# Altium PCB SyncBoard1.PcbDoc (part 3 of 4)
Units mm, origin at the board's own origin, x right, y up, seen from the top; angles counter-clockwise.
Board outline 300 x 250 mm, 2 copper layers (Top Layer, Bottom Layer); 311 components, 299 nets, 1572 pads, 3310 vias.
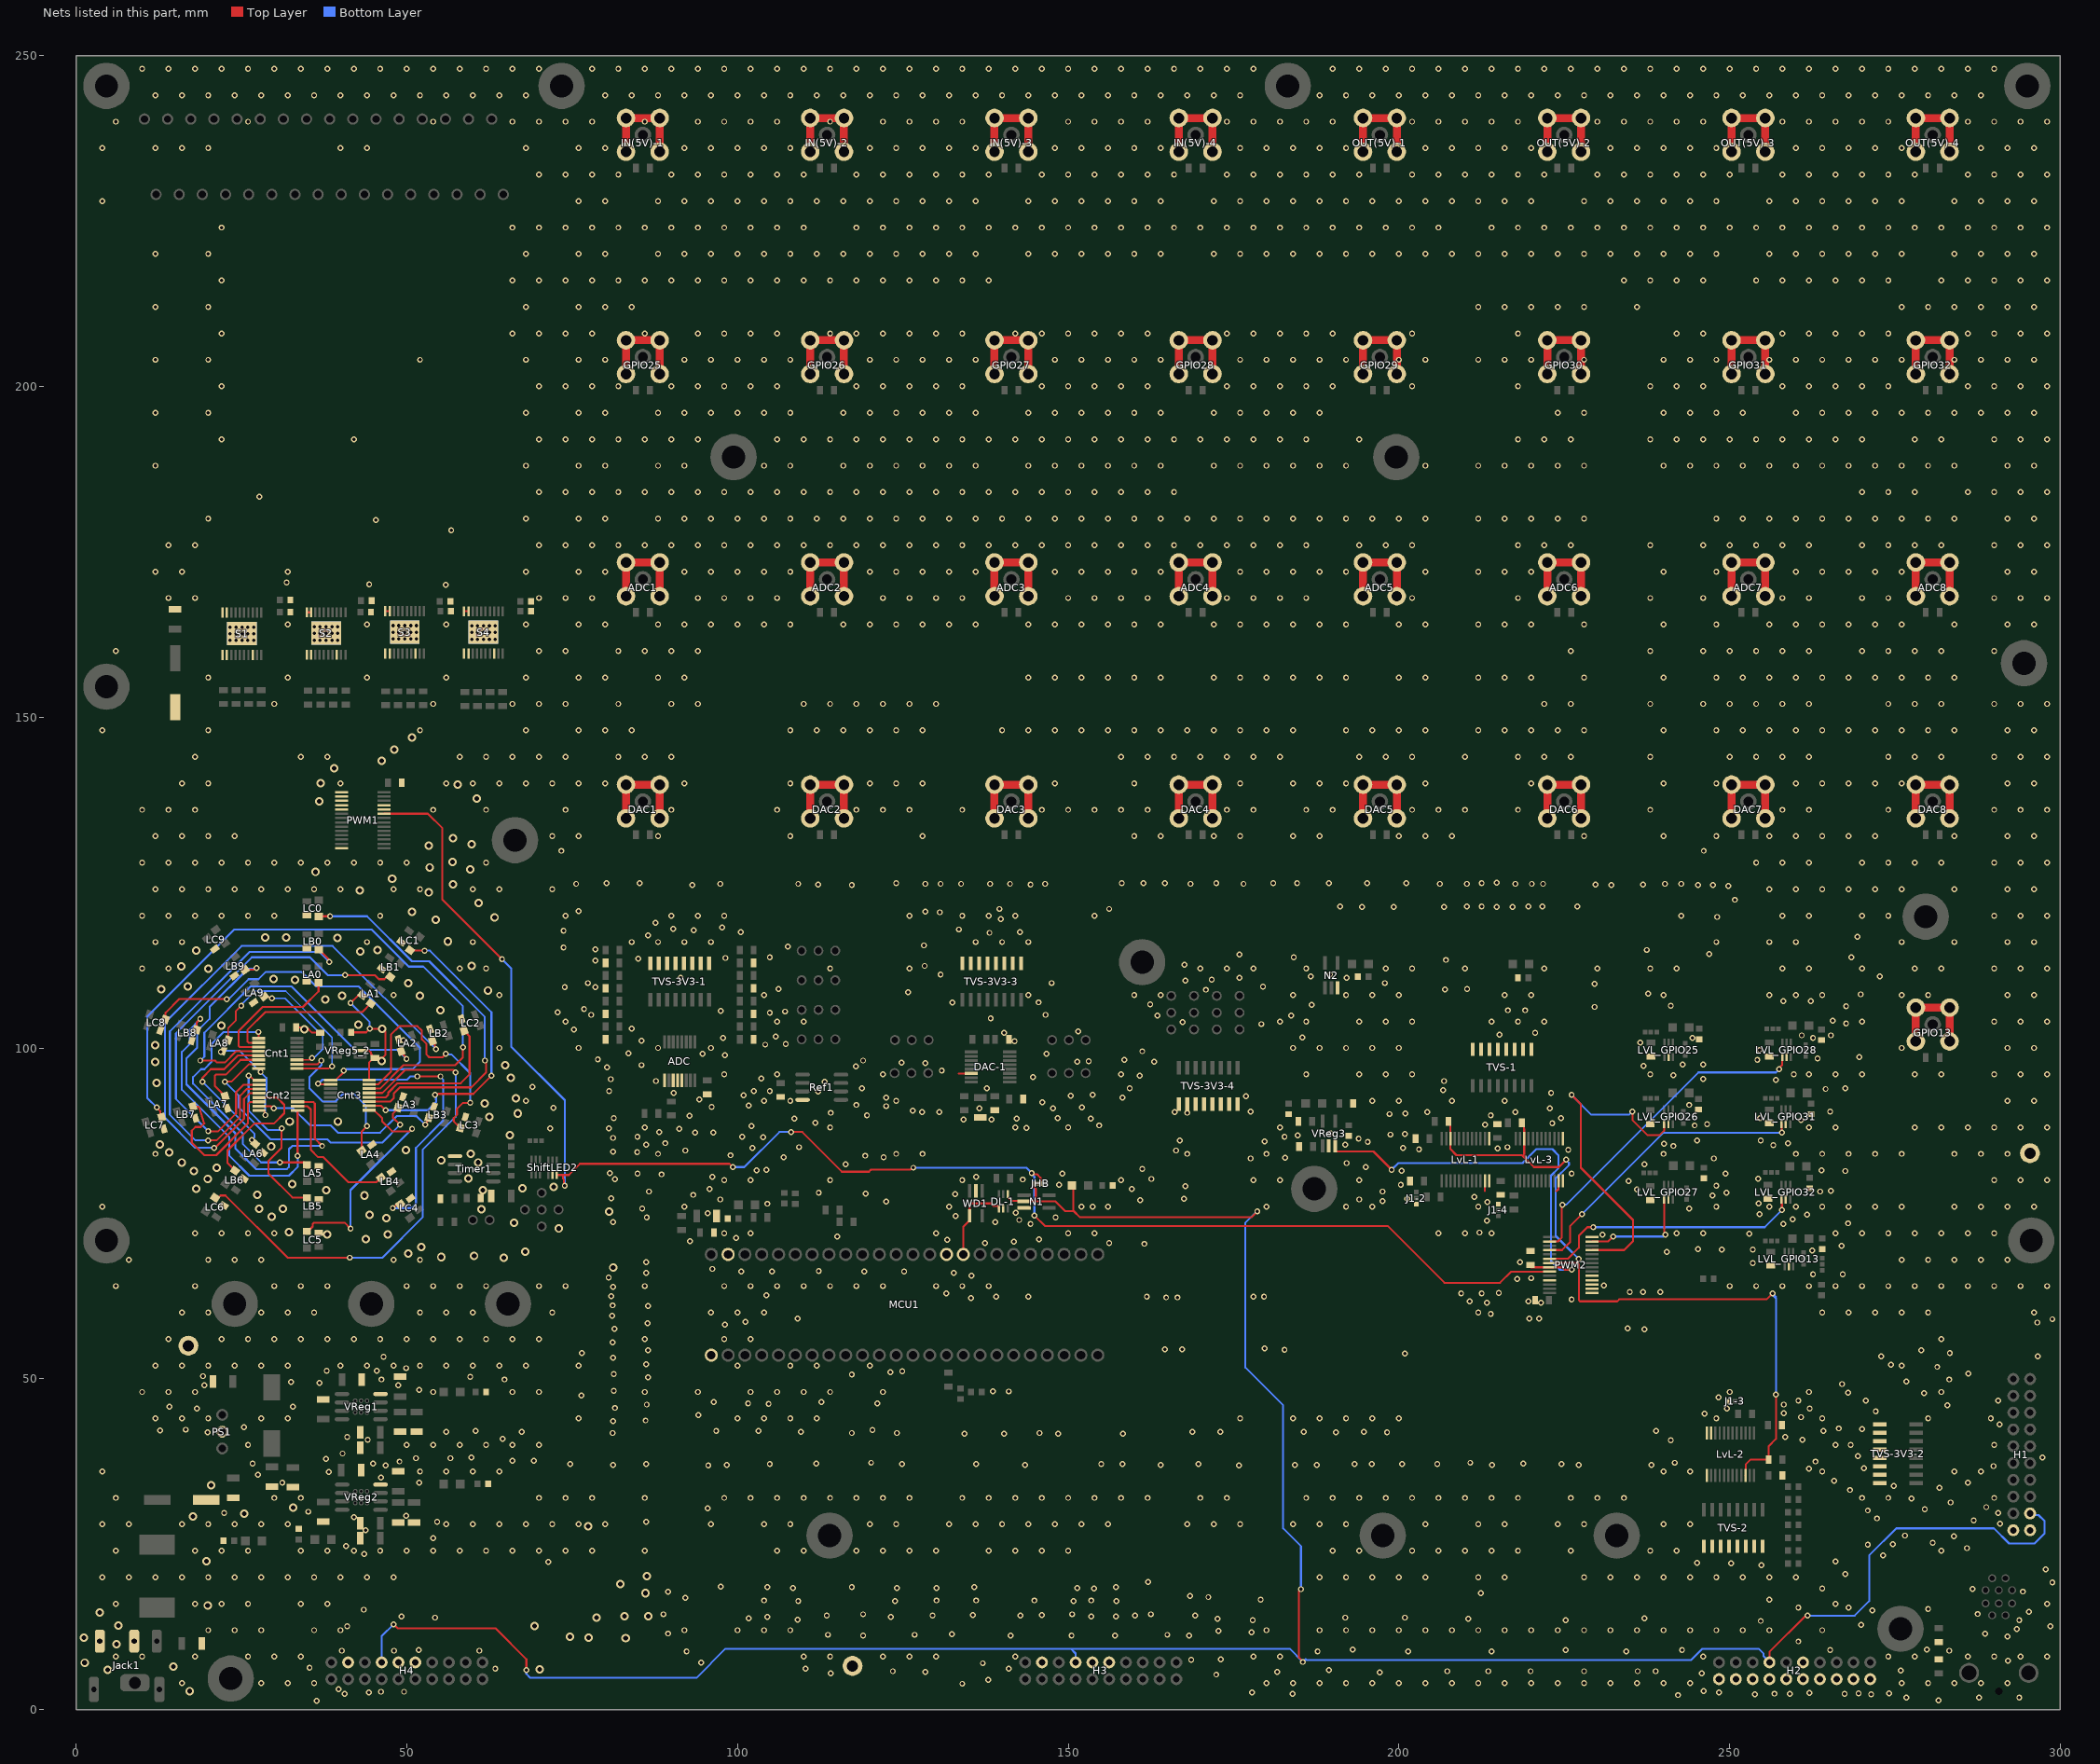
[diagram p3: the nets of this part, all layers, seen from the top]

## Via types
v1: diameter 0.9, hole 0.5, Top Layer to Bottom Layer, tented both sides, 3146 vias
v2: diameter 1.27, hole 0.711, Top Layer to Bottom Layer, tented both sides, 164 vias

## Nets (pads, with @x,y where several pads share a name; then routed paths per layer and width w, separated by ;. In a path a pad name is that pad's centre, name@x,y a point inside that pad or via, vN(x,y) a via of type N, cw(c..) or ccw(c..) an arc to the next point about the centre after c; other vN are vias at no path point) (continued)
en2: LVL_GPIO26.1 PWM2.11 | length 51.7
  Top Layer w0.3: v1(226.1,92.9) 227.5,91.5 227.5,81.9 235.4,74 235.4,70.8 234.05,69.45 PWM2.11@229.2,69.45 ; v1(235.3,90.4) 235.3,89.1 237.6,86.8 239.4,86.8 240.1,87.5 LVL_GPIO26.1@240.1,88.5
  Bottom Layer w0.3: v1(226.1,92.9) 229.1,89.9 234.8,89.9 v1(235.3,90.4)
en3: LVL_GPIO27.1 PWM2.13 | length 16.9
  Top Layer w0.3: PWM2.13@229.2,70.75 231.65,70.75 v1(232.4,71.5) ; LVL_GPIO27.1@240.1,77.1 240.1,72.162 240.3,71.962 v1(240.3,71.8)
  Bottom Layer w0.3: v1(232.4,71.5) 240,71.5 v1(240.3,71.8)
en4: LVL_GPIO28.1 PWM2.16 | length 50.5
  Top Layer w0.3: PWM2.16@222.8,70.75 224.05,70.75 224.6,71.3 224.6,76.2 v1@224.5,76.3 ; v1(257.5,96.8) 257.5,96.962 257.95,97.412 LVL_GPIO28.1@257.95,98.6
  Bottom Layer w0.3: v1@224.5,76.3 225.3,76.3 245.3,96.3 257,96.3 v1(257.5,96.8)
  other v1: 224.7,76.3
en5: LVL_GPIO31.1 PWM2.18 | length 45.2
  Top Layer w0.3: PWM2.18@222.8,69.45 224.65,69.45 225.9,70.7 225.9,73.1 v1(227.7,74.9) ; LVL_GPIO31.1@257.85,88.5 257.875,88.475 257.875,87.225 v1(257.9,87.2)
  Bottom Layer w0.3: v1(227.7,74.9) 240,87.2 v1(257.9,87.2)
en6: LVL_GPIO32.1 PWM2.20 | length 40.8
  Top Layer w0.3: PWM2.20@222.8,68.15 225.55,68.15 227.2,69.8 227.2,71.6 228.5,72.9 v1(229.4,72.9) ; LVL_GPIO32.1@257.85,77.1 257.875,77.075 257.875,76.425 257.9,76.4 v1(257.9,75.5)
  Bottom Layer w0.3: v1(229.4,72.9) 255.3,72.9 v1(257.9,75.5)
En7: LvL-1.22 LvL-2.22 LvL-3.22 PWM2.21 R1-9.2 R1-11.2 R1-13.2 | length 118.5
  Top Layer w0.3: R1-9.2@207.8,88.9 LvL-1.22@207.8,86.3 207.8,84.7 208.7,83.8 218.6,83.8 218.95,83.45 ; R1-13.2@218.6,88.7 218.9,88.4 218.9,87.8 218.95,87.75 LvL-3.22@218.95,86.3 218.95,83.45 ; PWM2.21@222.8,67.5 227.024,67.5 ; v1(225.3,83.1) 224.2,82 220.4,82 218.95,83.45 ; v1(227.2,68.1) 227.085,67.985 227.085,67.561 227.024,67.5 ; LvL-2.22@252.4,35.4 252.425,35.425 252.425,37.025 253.2,37.8 R1-11.2@255.9,37.8 255.9,39.8 257,40.9 v1(257,47.6) ; v1(256.5,62.9) 255.6,62 233.3,62 233,61.7 227.376,61.7 227.2,61.876 227.2,67.324 227.024,67.5
  Bottom Layer w0.3: v1(225.3,83.1) 225.3,83.024 225.7,82.624 225.7,82.3 223.7,80.3 223.7,71.6 225.6,69.7 v1(227.2,68.1) ; v1(257,47.6) 257,62.138 256.5,62.638 v1(256.5,62.9) 257,62.4
En8: PWM2.22 R1-7.2 VReg3.3 | length 63.8
  Top Layer w0.3: VReg3.3@190.35,85.2 190.35,84.475 190.475,84.35 196.15,84.35 v1(198.9,81.6) ; R1-7.2@219.9,66.9 219.95,66.85 PWM2.22@222.8,66.85 224.724,66.85 225.074,66.5 226.111,66.5 v1(226.121,66.511)
  Bottom Layer w0.3: v1(198.9,81.6) 199.9,82.6 218.69,82.6 220.79,84.7 223.2,84.7 224.1,83.8 224.1,81.8 223,80.7 223,67.8 224.3,66.5 226.111,66.5 v1(226.121,66.511)
GND: ADC1.2 ADC2.2 ADC3.2 ADC4.2 ADC5.2 ADC6.2 ADC7.2 ADC8.2 ADC.9 ADC.11 ADC.12 ADC.13 C1-2.1 C1-3.1 C1-4.1 C1-8.1 C1-9.1 C1-10.2 C1-11.1 C1-12.1 C1-13.2 C1-14.1 C1-15.2 C1-16.1 C1-17.2 C1-18.1 C1-19.1 C1-20.1 C1-21.1 C1-22.1 C1-23.1 C1-24.1 C1-25.2 C1-26.2 C2-1.1 C2-2.2 C3-1.2 C3-2.2 C3-2B.2 C3-3.2 C3-4.2 C4-1.2 C4-2.2 C4-3.2 C4-4.1 C4-5.1 C4-6.1 C4-7.1 C4-8.2 C4-9.2 C4-10.2 C4-11.1 C4-12.1 C4-13.1 C4-14.1 C5-1.1 C5-2.1 C5-3.1 C5-4.1 C5-5.1 C5-6.1 C5-7.1 C5-8.1 C6-1.2 C6-2.2 C7-1.2 C7-2.2 C8-1.1 C8-2.1 C9-1.1 CE-1.2 CE-1B.2 Cnt1.8 Cnt2.8 Cnt3.8 DAC1.2 DAC2.2 DAC3.2 DAC4.2 DAC5.2 DAC6.2 DAC7.2 DAC8.2 DAC-1.14 DL-1.2 GPIO13.2 GPIO25.2 GPIO26.2 GPIO27.2 GPIO28.2 GPIO29.2 GPIO30.2 GPIO31.2 GPIO32.2 H1.10 H1.11 H2.1 H2.2 H2.3 H2.4 H2.5 H2.6 H2.7 H2.8 H2.9 H2.10 H2.16 H3.12 H3.15 H3.16 H4.12 H4.15 H4.16 IN(5V)-1.2 IN(5V)-2.2 IN(5V)-3.2 IN(5V)-4.2 J1-2.3 J1-3.3 J1-4.3 Jack1.2 Jack1.3 LA0.2 LA1.2 LA2.2 LA3.2 LA4.2 LA5.2 LA6.2 LA7.2 LA8.2 LA9.2 LB0.2 LB1.2 LB2.2 LB3.2 LB4.2 LB5.2 LB6.2 LB7.2 LB8.2 LB9.2 LC0.2 LC1.2 LC2.2 LC3.2 LC4.2 LC5.2 LC6.2 LC7.2 LC8.2 LC9.2 LvL-1.11 LvL-1.12 LvL-1.13 LvL-2.11 LvL-2.12 LvL-2.13 LvL-3.11 LvL-3.12 LvL-3.13 LVL_GPIO13.2 LVL_GPIO25.2 LVL_GPIO26.2 LVL_GPIO27.2 LVL_GPIO28.2 LVL_GPIO31.2 LVL_GPIO32.2 MCU1.0 MCU1.33 MCU1.46 N1.3 N2.3 OUT(5V)-1.2 OUT(5V)-2.2 OUT(5V)-3.2 OUT(5V)-4.2 PS1.2 PWM1.1 PWM1.2 PWM1.3 PWM1.4 PWM1.5 PWM1.14 PWM1.24 PWM1.25 PWM2.1 PWM2.2 PWM2.3 PWM2.4 PWM2.5 PWM2.14 PWM2.25 R1-1.2 R1-7.1 R1-31.2 R1-32.2 R2-1.1 R3-4.1 R3-5.1 R6-1.2 R6-1B.2 R6-2.2 R6-2B.2 R6-3.2 R6-4.2 R6-5.2 R6-6.2 R6-7.2 R6-8.2 R6-9.2 R6-10.2 R6-11.2 R6-12.2 R6-13.2 R6-14.2 R7-1.2 R7-2.2 R7-3.2 R7-4.2 R7-5.2 R7-6.2 R7-7.2 R7-8.2 Ref1.4 S1.1 S1.2 S1.8 S1.19 S1.20 S1.21 S2.1 S2.2 S2.8 S2.19 S2.20 S2.21 S3.1 S3.2 S3.8 S3.19 S3.20 S3.21 S4.1 S4.2 S4.8 S4.19 S4.20 S4.21 ShiftLED2.2 T1.1 T2.1 T3.1 Timer1.1 TVS-1.1 TVS-1.2 TVS-1.3 TVS-1.4 TVS-1.5 TVS-1.6 TVS-1.7 TVS-1.8 TVS-2.1 TVS-2.2 TVS-2.3 TVS-2.4 TVS-2.5 TVS-2.6 TVS-2.7 TVS-2.8 TVS-3V3-1.1 TVS-3V3-1.2 TVS-3V3-1.3 TVS-3V3-1.4 TVS-3V3-1.5 TVS-3V3-1.6 TVS-3V3-1.7 TVS-3V3-1.8 TVS-3V3-2.1 TVS-3V3-2.2 TVS-3V3-2.3 TVS-3V3-2.4 TVS-3V3-2.5 TVS-3V3-2.6 TVS-3V3-2.7 TVS-3V3-2.8 TVS-3V3-3.1 TVS-3V3-3.2 TVS-3V3-3.3 TVS-3V3-3.4 TVS-3V3-3.5 TVS-3V3-3.6 TVS-3V3-3.7 TVS-3V3-3.8 TVS-3V3-4.1 TVS-3V3-4.2 TVS-3V3-4.3 TVS-3V3-4.4 TVS-3V3-4.5 TVS-3V3-4.6 TVS-3V3-4.7 TVS-3V3-4.8 VReg1.4 VReg2.4 VReg3.2 VReg5_2.2 WD1.2 | length 52
  Top Layer w0.3: v1@27.6,96.675 Cnt1.8@27.6,96.9 ; Cnt2.8@27.7,90.55 28.475,90.55 28.55,90.475 28.55,89.925 v1(28.621,89.854) ; R1-32.2@33.3,103.1 34.9,103.1 35.7,102.3 C7-2.2@36.9,102.3 ; S2.20@34.875,165.85 S2.19@35.525,165.85 ; v1(41.5,106.8) 42.65,107.95 43.212,107.95 LA1.2@43.231,107.931 ; C8-2.1@41.576,102.359 43.859,102.359 v1(44.4,102.9) 46.4,102.9 46.8,102.5 46.8,99 46.3,98.5 C6-2.2@45.2,98.5 C6-2.2@45,98.5 ; VReg5_2.2@42.956,99.607 44.293,99.607 44.6,99.3 44.6,99.1 44.7,99 44.7,98.8 C6-2.2@45,98.5 ; Cnt3.8@44.3,95.15 44.3,97.8 C6-2.2@45,98.5 ; S3.20@46.775,166.016 S3.19@47.425,166.016 ; S4.20@58.675,166 S4.19@59.325,166 ; 133.47,96.15 DAC-1.14@135.346,96.15 ; 213,78.38 LvL-1.11@213,79.9 ; 223.75,78.36 223.829,78.36 224.125,78.656 224.125,79.875 LvL-3.11@224.15,79.9
  Bottom Layer w0.3: v1(21.9,99.4) 22.1,99.6 24.675,99.6 28.8,95.475 28.8,92.835 28.621,92.656 v1(28.621,89.854) ; v1(41.5,106.8) 44.4,103.9 v1(44.4,102.9)
  other v1: 36.4,1.3 281.6,1.4 276.7,1.8 287.7,1.8 293.8,1.8 242.2,2.2 253.8,2.3 271.4,2.3 40.6,2.4 183.9,2.4 259.1,2.4 267.38,2.4 256.8,2.41 274.12,2.44 269.5,2.47 262.04,2.54 44.3,2.6 177.8,2.6 248.4,2.6 46.1,2.7 49.6,2.7 246.08,2.81 39.7,3.1 134,3.9 16,4 28,4 32,4 36,4 180,4 184,4 188,4 192,4 196,4 200,4 204,4 208,4 212,4 216,4 220,4 224,4 228,4 232,4 236,4 240,4 244,4 276,4 280,4 284,4 288,4 292,4 137.9,4.5 172.4,5.3 114.1,5.5 245.8,5.5 197.1,5.6 128.4,5.7 181.6,5.7 123.5,5.8 207.3,5.8 213.5,5.8 219.9,5.8 228,5.8 236.1,5.8 238.8,5.8 275.9,5.9 189.4,6 63.4,6.2 110.3,6.2 141,6.2 35.3,6.3 137.1,7 94.5,7.1 292.1,7.4 168.6,7.5 173.1,7.6 6,8 10,8 18,8 26,8 30,8 34,8 110,8 114,8 122,8 126,8 130,8 142,8 178,8 182,8 246,8 274,8 278,8 286,8 290,8 294,8 298,8 92.3,8.8 187.7,8.8 201.4,8.8 214,8.8 234.4,8.8 40.2,8.9 48.1,8.9 61,8.9 283.2,8.9 51.8,9 225.2,9 242.8,9 265.2,9 193,9.1 279.8,9.1 260.4,10.3 291.99,11.04 119,11.2 141.3,11.2 150.5,11.2 157.1,11.2 168.3,11.2 113.7,11.3 126.8,11.3 165,11.3 132.4,11.4 288.62,11.46 89.5,11.5 177.7,11.7 172.7,11.9 20,12 24,12 28,12 36,12 40,12 92,12 100,12 104,12 108,12 180,12 188,12 192,12 196,12 200,12 204,12 208,12 212,12 216,12 220,12 224,12 228,12 232,12 236,12 240,12 244,12 248,12 252,12 256,12 264,12 293.4,12.15 41,12.6 298.5,12.6 269.9,12.8 254.7,13.4 177.9,13.5 225.2,13.5 293.8,13.5 109.1,13.6 172.6,13.7 210.5,13.7 101.7,13.8 237.1,13.8 54.3,13.9 191.9,13.9 200.9,13.9 104.5,14 123.2,14 49.2,14.1 153.5,14.1 157.2,14.1 113.5,14.2 129.5,14.2 142.8,14.2 160.1,14.2 169.2,14.2 135.6,14.3 146,14.3 88.8,14.4 119,14.4 150.6,14.4 162.5,14.4 287.48,14.46 295.27,14.8 271.6,15 43.5,15.1 280,15.2 260.4,15.4 268,15.4 6,16 18,16 22,16 26,16 34,16 38,16 266,16 298,16 109.2,16.4 123.8,16.4 150.8,16.4 157.3,16.4 104,16.5 130.1,16.5 136.1,16.5 144.9,16.5 153.5,16.5 179.1,16.6 256,16.6 92.1,16.9 171.2,17 168.4,17.2 212.4,17.6 89.5,17.8 294.33,17.84 286.71,18.21 153.9,18.3 264,18.3 108.4,18.4 124.1,18.4 130.1,18.4 151.4,18.4 104.5,18.5 117.3,18.5 135.8,18.5 157.2,18.5 97.5,18.6 298.8,19.2 162.1,19.3 4,20 8,20 12,20 16,20 20,20 24,20 28,20 32,20 36,20 40,20 44,20 48,20 188,20 192,20 196,20 200,20 204,20 212,20 216,20 228,20 232,20 236,20 240,20 244,20 248,20 252,20 256,20 260,20 267.5,20.5 297.8,21.2 254.8,21.8 250.2,22.1 245.1,22.2 71.4,22.3 266,22.4 273.205,23.315 43.6,23.5 6,24 18,24 22,24 26,24 34,24 38,24 42,24 46,24 50,24 54,24 58,24 62,24 66,24 70,24 74,24 78,24 86,24 106,24 110,24 118,24 122,24 126,24 130,24 138,24 142,24 146,24 150,24 190,24 194,24 202,24 206,24 210,24 214,24 218,24 226,24 238,24 242,24 282,24 285.9,24.4 40.8,24.7 270.9,24.9 274.7,25 280.7,25.2 54,25.9 283.9,26.2 276.5,26.3 43.8,27.1 4,28 8,28 16,28 20,28 24,28 28,28 32,28 56,28 60,28 64,28 68,28 72,28 76,28 80,28 96,28 104,28 108,28 120,28 124,28 132,28 136,28 140,28 144,28 148,28 152,28 156,28 168,28 172,28 176,28 184,28 188,28 192,28 204,28 212,28 216,28 224,28 228,28 240,28 244,28 290.9,28.1 54.6,28.4 86.2,28.4 286.9,28.6 272.3,28.9 42,29.1 49.9,29.3 22.4,29.7 290.6,29.7 35.1,29.9 270.9,30.1 279.5,30.3 95.5,30.4 288.8,30.6 283.4,31.3 277.5,31.9 6,32 30,32 34,32 70,32 74,32 78,32 86,32 98,32 102,32 106,32 110,32 114,32 118,32 122,32 126,32 134,32 138,32 142,32 146,32 150,32 154,32 158,32 162,32 170,32 174,32 186,32 190,32 194,32 198,32 202,32 206,32 210,32 214,32 218,32 226,32 230,32 234,32 270,32 274,32 290,32 268.2,33.2 281.7,33.5 274.8,33.8 31.2,34.3 51.9,34.3 286,34.3 265.8,34.6 46.1,35.1 27.5,35.5 38.2,35.9 4,36 52,36 56,36 60,36 64,36 240,36 244,36 264,36 284,36 288,36 262,36.4 270.3,36.5 289.9,36.8 46.8,36.9 95.6,36.9 175.8,36.9 81.2,37 98.4,37 143.5,37 164,37 184.3,37 187.6,37 214.1,37 227.2,37 238.2,37 74.7,37.1 86.2,37.1 104.9,37.1 124.9,37.1 136.1,37.1 155,37.1 158.2,37.1 169.7,37.1 193.3,37.1 195.9,37.1 200.5,37.1 205.8,37.1 224.6,37.1 26.7,37.2 44.9,37.2 111.9,37.2 218.8,37.2 120.2,37.3 210.8,37.3 241.7,37.3 48.9,37.5 263,37.5 66,37.6 69.2,37.6 37.8,37.9 51.4,38 56.6,38 59.8,38.1 297.3,38.1 269.4,38.3 40.3,38.7 26,40 50,40 54,40 58,40 62,40 66,40 70,40 266,40 268.3,40 290,40 241.1,40.7 44.1,40.8 261,40.8 64.5,40.9 41,41.2 258.4,41.2 134.3,41.7 140.3,41.7 148.5,41.7 158.3,41.7 81.1,41.8 117.3,41.8 124.1,41.8 145.67,41.8 19.9,41.9 190.5,41.9 198.2,41.9 56,42 67.4,42 109.6,42 168.8,42 173,42 185.6,42 194.7,42 60.4,42.1 96.8,42.1 103.2,42.1 238.9,42.1 264.2,42.1 12.7,42.2 120.41,42.24 16.6,42.3 270,42.4 266.5,42.5 25.4,42.7 290.8,43.1 81.2,43.6 86.1,43.7 12,44 16,44 20,44 28,44 32,44 76,44 100,44 104,44 108,44 112,44 176,44 184,44 188,44 192,44 196,44 200,44 248,44 264,44 280,44 289.5,44 260.8,44.2 94.1,44.5 246.2,44.7 258.2,44.8 272.1,45.1 18.3,45.5 249.6,45.5 262.1,45.5 81.5,45.6 14.1,45.8 32.8,45.8 282.9,46 86.3,46.1 258.2,46.1 104.7,46.2 101.6,46.3 121.16,46.3 96.4,46.5 112.7,46.5 260.4,46.7 270.6,46.7 290.6,46.7 248.3,47.2 76.4,47.5 279.4,47.8 267.9,47.9 10,48 14,48 18,48 54,48 66,48 70,48 86,48 94,48 102,48 106,48 110,48 114,48 122,48 250,48 262,48 282,48 140.99,48.08 138.64,48.12 81.3,48.2 51.9,48.3 19.4,49 48.7,49 267,49.2 36.8,49.4 32.5,49.5 276.7,49.6 46.2,49.9 64.8,49.9 283.2,49.9 86.5,50.2 59.6,50.3 19.2,50.4 117.3,50.65 81.3,50.7 286.1,50.8 123.1,50.97 124.92,51.15 37.9,51.2 45.5,51.2 49.9,51.6 281.4,51.8 12,52 16,52 20,52 24,52 28,52 32,52 40,52 44,52 48,52 52,52 56,52 60,52 64,52 68,52 76,52 100,52 108,52 112,52 120,52 276,52 274.4,52.1 86.2,52.2 81.2,53.2 46.5,53.3 272.9,53.4 296.6,53.4 200.9,53.8 76.5,53.9 283.3,53.9 86.5,54.3 279,54.3 182.7,54.4 164.64,54.47 167.2,54.46 179.7,54.6 81.1,55.5 14,56 22,56 26,56 30,56 34,56 38,56 42,56 46,56 50,56 54,56 58,56 62,56 66,56 70,56 86,56 98,56 102,56 282,56 237.1,57.5 81.39,57.575 234.6,57.6 98.1,58.2 86.4,58.4 296.5,58.5 101.2,58.6 298.8,59 109.1,59.1 219.7,59.1 221.2,59.1 81.08,59.5 213.9,59.8 16,60 20,60 28,60 32,60 36,60 52,60 56,60 60,60 72,60 96,60 100,60 104,60 212,60 264,60 268,60 272,60 276,60 280,60 296,60 86.5,61 81.1,61.1 213.3,61.5 221.5,61.5 210.7,61.7 219.6,61.7 226.1,62 135.3,62.2 164.8,62.3 166.5,62.3 139.1,62.4 144,62.4 161.9,62.4 178,62.4 179.6,62.4 80.92,62.5 104.4,62.6 131.6,62.9 209.4,62.9 212.5,62.9 215.1,63 234.9,63.1 236.9,63.1 239.5,63.1 81.2,63.9 6,64 18,64 30,64 34,64 38,64 50,64 54,64 58,64 62,64 70,64 74,64 86,64 98,64 102,64 106,64 110,64 114,64 118,64 122,64 130,64 134,64 138,64 250,64 254,64 258,64 262,64 266,64 270,64 274,64 278,64 282,64 286,64 290,64 294,64 298,64 231,64.1 217.9,65.1 220,65.2 80.53,65.29 135.4,65.6 262.6,65.8 267.1,65.8 86.2,66 132.7,66 100.6,66.2 105.2,66.2 119.2,66.2 125.2,66.2 112.3,66.3 96.2,66.6 253.5,67.5 86.2,67.6 218.3,67.6 8,68 20,68 24,68 28,68 48,68 52,68 276,68 280,68 284,68 288,68 292,68 240.5,69.2 262.5,69.4 248.8,69.5 253.5,69.5 245.2,69.6 266.9,70.1 161.5,70.4 137.4,70.5 156.2,70.5 141.8,70.7 92.8,70.8 131.7,71 145.6,71.1 99.8,71.3 115.1,71.5 230.8,71.8 253,71.9 18,72 22,72 26,72 30,72 98,72 102,72 130,72 150,72 154,72 206,72 210,72 214,72 242,72 246,72 266,72 270,72 274,72 278,72 282,72 286,72 290,72 212.2,72.1 144.3,73.4 258.1,73.4 267.9,73.5 81.2,73.7 139,73.7 213.3,73.9 142.6,74 259.5,74.1 86.3,74.4 148.1,74.4 133,74.6 261.7,74.8 254.5,74.9 95.5,75 142.1,75.1 85.6,75.7 243.91,75.75 4,76 92,76 132,76 152,76 153.7,76 156,76 180,76 192,76 196,76 212,76 248,76 256,76 260,76 264,76 268,76 272,76 276,76 284,76 288,76 292,76 296,76 104.536,76.461 254.4,76.5 213.4,76.7 122.5,76.8 197.52,76.84 160.9,77 97.4,77.1 194,77.1 167.5,77.2 201.25,77.22 80.9,77.3 211.4,77.5 247.4,77.7 93.3,77.8 132.9,77.9 119.4,78 112.3,78.1 249.5,78.1 86.6,78.3 197.5,78.3 263.7,78.3 265.3,78.4 236,78.64 95.8,78.7 159.6,78.7 167.7,79.1 248,79.2 148.6,79.3 200.3,79.32 234.73,79.87 98,80 102,80 114,80 134,80 158,80 178,80 182,80 194,80 290,80 294,80 298,80 81.48,80.14 143.108,80.124 162.6,80.2 254.296,80.259 96.2,80.5 136.1,80.5 88.5,80.9 84.9,81 149.1,81 226.1,81 249.4,81 80.7,81.1 267.5,81.4 200.4,81.45 102.9,81.52 263.9,81.5 104.4,81.6 161.2,81.7 195,82 237.1,82.4 116.35,82.44 192.1,82.6 177.6,83.3 247.6,83.3 182.8,83.4 107,83.5 122.1,83.5 119.31,83.72 98.98,83.79 12,84 88,84 124,84 128,84 168,84 180,84 240,84 260,84 264,84 268,84 272,84 276,84 284,84 288,84 292,84 84.83,84.25 81.2,84.3 92.1,84.5 166.3,84.5 225.6,84.6 203.048,84.65 214.9,84.8 102.27,84.9 200.6,84.9 109.3,85 216.4,85 241.5,85.2 256.6,85.3 86.2,85.4 191.9,85.4 240.1,85.5 258.8,85.6 89.1,85.62 195.3,85.8 179.7,85.9 166.9,86 245.1,86 254.7,86 193.9,86.3 81.2,86.4 103.9,86.5 84.89,86.58 100.69,86.6 182.7,86.6 184.7,86.8 198.7,86.9 200.9,87 189.7,87.1 93.59,87.19 96.34,87.22 88.2,87.3 91.21,87.77 71.68,87.85 80.57,87.86 143.7,87.9 86,88 114,88 142,88 150,88 182,88 262,88 266,88 278,88 282,88 286,88 290,88 294,88 298,88 102.1,88.2 154.7,88.3 244.7,88.3 213,88.4 246.6,88.5 223.2,88.6 111.8,88.7 260.8,89.1 134.2,89.2 138.4,89.2 108.6,89.3 142.2,89.3 153.4,89.3 81.3,89.4 148.4,89.4 224.5,89.4 254.6,89.4 92.758,89.742 213.9,89.8 119.57,89.82 198.6,90 201,90.1 114.1,90.2 168,90.2 127.9,90.3 130.5,90.3 166.1,90.3 204.3,90.3 217.6,90.3 177.6,90.4 265.2,90.4 126.5,90.5 136.6,90.9 147.7,90.9 222.8,90.9 72.19,90.97 152.1,91 96.1,91.1 122.5,91.2 101.7,91.3 118,91.4 243.9,91.4 146.1,91.8 68,92 104,92 108,92 124,92 196,92 200,92 208,92 216,92 292,92 296,92 94.21,92.21 122.5,92.5 158.2,92.5 176.9,92.7 150.4,92.8 100.91,92.87 153.7,92.9 90.38,93.19 223,93.2 112.2,93.4 80.6,93.5 102.5,93.5 104.9,93.5 206.7,93.6 264.5,93.8 118.8,93.9 137.7,93.9 159.3,93.9 267.5,93.9 69.01,94.11 113.2,94.9 87.7,95 206.8,95 257,95.2 80.83,95.28 246,95.3 103.6,95.4 144.7,95.6 160.8,95.8 241.5,95.9 98,96 106,96 122,96 158,96 186,96 194,96 198,96 202,96 238,96 259.7,96 262,96 266,96 270,96 278,96 282,96 290,96 294,96 298,96 27.9,96.375 130.9,96.6 80.3,97.1 117.9,97.2 237,97.3 85.5,97.4 242.9,97.5 246,97.5 128.4,97.7 124.8,97.8 151.4,97.9 163,97.9 153.1,98 119,98.1 158.5,98.2 254.2,98.2 78.9,98.3 263.3,98.4 269.6,98.6 98.1,98.9 94.7,99.1 146.7,99.1 83.5,99.2 161.2,99.5 254.5,99.7 64,100 76,100 88,100 96,100 184,100 188,100 192,100 196,100 200,100 276,100 292,100 296,100 104.2,100.5 107.3,100.6 236.5,100.8 141.9,101 85.5,101.1 49.512,101.15 97.8,101.5 244.4,101.5 262.6,101.5 185.4,101.6 105.8,101.7 260.9,101.9 265.3,101.9 215.2,102 140.3,102.3 220.6,102.3 151.5,102.5 75.3,102.8 84,102.9 179.2,103.6 267.6,103.7 167.3,103.9 74,104 106,104 110,104 182,104 186,104 194,104 198,104 202,104 214,104 218,104 222,104 270,104 290,104 294,104 298,104 265.6,104.1 138.3,104.5 163.5,104.9 183.7,104.9 77.9,105 146.6,105 104.9,105.3 72.8,105.4 107.2,105.5 97.5,105.6 216.5,105.7 219.1,105.7 76.8,105.9 229.6,106.2 267.6,106.3 241.1,106.4 186.8,106.5 162.4,106.6 132.487,106.889 145.5,106.9 258.1,107.1 262.3,107.1 48,108 64,108 104,108 144,108 160,108 164,108 184,108 192,108 196,108 200,108 216,108 220,108 240,108 256,108 260,108 264,108 276,108 280,108 292,108 296,108 269.8,108.1 237.7,108.2 125.8,108.4 170.8,108.8 206.98,108.83 106.2,108.9 210.31,108.9 73.9,109.2 78.5,109.2 179.45,109.24 229.6,109.7 77.4,109.8 147.5,109.8 197.9,109.8 167.7,110.2 171.7,110.3 91.4,110.6 175.9,110.6 192.1,110.6 186.7,110.8 272.7,110.8 130.7,111.1 189.6,111.1 10,112 14,112 58,112 62,112 114,112 126,112 170,112 174,112 178,112 186,112 198,112 202,112 210,112 222,112 230,112 238,112 242,112 258,112 262,112 270,112 278,112 282,112 290,112 294,112 298,112 128.3,112.4 167.6,112.6 78.5,113.2 207.09,113.31 85,113.5 98.2,113.6 104.9,113.7 184.1,113.7 268.4,113.7 175.9,114.1 246.9,114.2 237.5,114.8 78.5,114.9 73.7,115.2 107.6,115.3 128.2,115.5 12,116 16,116 44,116 60,116 84,116 88,116 92,116 96,116 136,116 140,116 144,116 248,116 256,116 260,116 276,116 284,116 292,116 296,116 269.3,116.8 86.5,117 138.1,117.4 100.5,117.5 142.7,117.5 73.7,117.7 93.4,117.8 133.5,117.9 90.3,118 97.7,118.2 87.6,118.9 139.8,119.5 248.1,119.8 10,120 14,120 18,120 22,120 26,120 30,120 46,120 74,120 90,120 94,120 98,120 126,120 134,120 138,120 142,120 154,120 242.7,120 258,120 262,120 270,120 274,120 290,120 294,120 298,120 130.6,120.5 128.4,120.6 76,120.7 139.6,121 156.2,121 194.4,121.3 199.2,121.3 206.8,121.3 214.8,121.3 217.2,121.3 191.1,121.4 210.3,121.4 212.5,121.4 219.6,121.4 221.7,121.4 227,121.4 250.8,122.4 12,124 16,124 20,124 24,124 28,124 32,124 36,124 40,124 48,124 52,124 60,124 64,124 72,124 256,124 260,124 264,124 268,124 272,124 276,124 284,124 292,124 296,124 249.8,124.5 93.2,124.6 117.3,124.6 232.1,124.6 245.2,124.6 247.5,124.6 112.2,124.7 144.3,124.7 229.7,124.7 236.9,124.7 75.6,124.8 97.4,124.8 109.2,124.8 128.4,124.8 130.7,124.8 133.8,124.8 138.2,124.8 141.2,124.8 146.5,124.8 168.5,124.8 176.5,124.8 206.2,124.8 210.3,124.8 217.6,124.8 220.1,124.8 221.8,124.8 240.2,124.8 242.7,124.8 80.2,124.9 85.2,124.9 124,124.9 158.1,124.9 161.4,124.9 164.6,124.9 172.4,124.9 181,124.9 184.6,124.9 189.4,124.9 195.2,124.9 201.1,124.9 212.5,124.9 214.8,125 10,128 14,128 18,128 22,128 26,128 30,128 34,128 38,128 42,128 46,128 50,128 62,128 254,128 258,128 262,128 270,128 274,128 278,128 282,128 290,128 294,128 298,128 73.4,129.8 246.1,129.8 12,132 16,132 20,132 24,132 72,132 76,132 88,132 108,132 128,132 160,132 164,132 172,132 176,132 184,132 188,132 200,132 204,132 208,132 228,132 240,132 248,132 256,132 260,132 264,132 268,132 272,132 284,132 292,132 296,132 10,136 14,136 18,136 54,136 62,136 74,136 90,136 106,136 118,136 122,136 126,136 134,136 146,136 150,136 154,136 158,136 162,136 174,136 178,136 186,136 190,136 202,136 206,136 210,136 218,136 238,136 258,136 262,136 274,136 290,136 294,136 298,136 16,140 20,140 40,140 56,140 60,140 64,140 68,140 72,140 76,140 80,140 92,140 108,140 120,140 124,140 128,140 148,140 160,140 176,140 184,140 188,140 192,140 204,140 220,140 240,140 248,140 260,140 264,140 268,140 272,140 276,140 292,140 296,140 18,144 34,144 38,144 58,144 62,144 66,144 70,144 74,144 82,144 86,144 90,144 158,144 162,144 166,144 170,144 174,144 178,144 182,144 194,144 198,144 202,144 210,144 218,144 222,144 226,144 238,144 250,144 254,144 258,144 262,144 274,144 278,144 282,144 290,144 294,144 298,144 4,148 20,148 52,148 68,148 76,148 80,148 84,148 108,148 112,148 116,148 120,148 124,148 128,148 140,148 144,148 148,148 152,148 156,148 160,148 164,148 168,148 172,148 176,148 180,148 184,148 192,148 196,148 200,148 204,148 212,148 216,148 220,148 224,148 228,148 240,148 248,148 252,148 256,148 260,148 264,148 268,148 272,148 276,148 280,148 284,148 292,148 296,148 30,152 54,152 66,152 70,152 74,152 82,152 90,152 94,152 110,152 114,152 118,152 122,152 126,152 130,152 222,152 226,152 238,152 246,152 250,152 254,152 258,152 262,152 274,152 278,152 282,152 290,152 294,152 298,152 20,156 32,156 44,156 56,156 68,156 76,156 80,156 88,156 92,156 144,156 148,156 152,156 156,156 160,156 164,156 172,156 176,156 180,156 184,156 188,156 192,156 200,156 204,156 212,156 216,156 220,156 228,156 240,156 248,156 252,156 256,156 260,156 264,156 268,156 272,156 276,156 280,156 284,156 6,160 70,160 74,160 82,160 86,160 90,160 94,160 226,160 238,160 246,160 250,160 254,160 258,160 262,160 270,160 274,160 278,160 282,160 290,160 32,164 44,164 56,164 68,164 76,164 80,164 88,164 92,164 96,164 100,164 104,164 108,164 116,164 120,164 124,164 128,164 132,164 136,164 144,164 148,164 152,164 156,164 160,164 164,164 172,164 176,164 180,164 184,164 188,164 192,164 200,164 204,164 212,164 216,164 220,164 228,164 240,164 248,164 256,164 260,164 264,164 268,164 272,164 276,164 284,164 292,164 296,164 14,168 18,168 70,168 74,168 78,168 94,168 98,168 102,168 106,168 122,168 126,168 130,168 134,168 150,168 154,168 158,168 162,168 174,168 178,168 182,168 186,168 202,168 218,168 238,168 246,168 258,168 262,168 270,168 274,168 290,168 294,168 298,168 55.91,169.98 44.32,170.09 31.84,170.36 12,172 16,172 32,172 68,172 76,172 80,172 92,172 96,172 100,172 104,172 108,172 120,172 124,172 128,172 132,172 136,172 148,172 152,172 156,172 160,172 164,172 176,172 180,172 184,172 188,172 192,172 204,172 212,172 216,172 220,172 240,172 248,172 260,172 264,172 268,172 272,172 276,172 292,172 296,172 14,176 18,176 70,176 74,176 78,176 82,176 86,176 90,176 94,176 98,176 102,176 106,176 110,176 114,176 118,176 122,176 126,176 130,176 134,176 138,176 142,176 146,176 150,176 154,176 158,176 162,176 166,176 170,176 174,176 178,176 182,176 186,176 194,176 198,176 202,176 218,176 222,176 226,176 238,176 246,176 250,176 254,176 258,176 262,176 270,176 274,176 278,176 282,176 290,176 294,176 298,176 56.72,178.23 45.334,179.819 20,180 68,180 76,180 80,180 88,180 92,180 96,180 100,180 104,180 108,180 112,180 116,180 120,180 124,180 128,180 132,180 136,180 140,180 144,180 148,180 152,180 156,180 160,180 164,180 168,180 172,180 176,180 180,180 184,180 188,180 192,180 196,180 200,180 204,180 212,180 216,180 220,180 224,180 228,180 248,180 252,180 256,180 260,180 264,180 268,180 272,180 276,180 280,180 284,180 292,180 296,180 27.74,183.33 70,184 74,184 78,184 82,184 86,184 90,184 94,184 98,184 102,184 106,184 110,184 114,184 118,184 122,184 126,184 130,184 134,184 138,184 142,184 146,184 150,184 154,184 158,184 162,184 166,184 270,184 274,184 278,184 286,184 290,184 294,184 298,184 12,188 68,188 76,188 80,188 88,188 92,188 104,188 108,188 116,188 120,188 124,188 128,188 132,188 136,188 144,188 148,188 152,188 156,188 160,188 164,188 172,188 176,188 180,188 184,188 188,188 192,188 204,188 212,188 216,188 220,188 224,188 228,188 240,188 244,188 248,188 252,188 256,188 260,188 264,188 268,188 272,188 276,188 280,188 284,188 292,188 296,188 22,192 42,192 70,192 74,192 78,192 82,192 86,192 90,192 94,192 106,192 110,192 114,192 118,192 122,192 126,192 130,192 134,192 138,192 142,192 146,192 150,192 154,192 158,192 162,192 166,192 170,192 174,192 178,192 182,192 186,192 194,192 218,192 222,192 226,192 238,192 242,192 246,192 250,192 254,192 258,192 262,192 266,192 270,192 278,192 282,192 290,192 294,192 298,192 12,196 20,196 68,196 76,196 80,196 88,196 92,196 96,196 100,196 104,196 108,196 116,196 120,196 124,196 128,196 132,196 136,196 144,196 148,196 152,196 156,196 160,196 164,196 172,196 176,196 180,196 184,196 188,196 224,196 228,196 240,196 244,196 248,196 252,196 260,196 264,196 268,196 272,196 276,196 280,196 284,196 288,196 292,196 296,196 22,200 70,200 74,200 78,200 82,200 90,200 94,200 98,200 102,200 106,200 118,200 122,200 126,200 130,200 134,200 146,200 150,200 154,200 158,200 162,200 174,200 178,200 182,200 186,200 190,200 202,200 218,200 238,200 242,200 246,200 258,200 262,200 266,200 270,200 274,200 286,200 290,200 294,200 298,200 12,204 20,204 52,204 68,204 76,204 80,204 92,204 96,204 100,204 104,204 108,204 120,204 124,204 128,204 132,204 136,204 148,204 152,204 156,204 160,204 164,204 176,204 180,204 184,204 188,204 192,204 200,204 204,204 212,204 216,204 220,204 228,204 240,204 244,204 248,204 256,204 260,204 264,204 268,204 272,204 276,204 284,204 288,204 292,204 296,204 22,208 66,208 70,208 74,208 78,208 86,208 94,208 98,208 102,208 106,208 114,208 118,208 122,208 126,208 130,208 134,208 142,208 146,208 150,208 154,208 158,208 162,208 174,208 178,208 182,208 186,208 190,208 202,208 218,208 242,208 246,208 258,208 262,208 266,208 270,208 274,208 286,208 290,208 294,208 298,208 12,212 20,212 68,212 76,212 80,212 84,212 212,212 216,212 220,212 224,212 228,212 236,212 276,212 280,212 284,212 288,212 292,212 296,212 22,216 66,216 70,216 74,216 78,216 82,216 86,216 90,216 94,216 98,216 102,216 106,216 110,216 114,216 118,216 122,216 126,216 130,216 134,216 138,216 234,216 238,216 242,216 246,216 254,216 258,216 262,216 266,216 270,216 274,216 282,216 286,216 290,216 294,216 298,216 12,220 20,220 68,220 76,220 80,220 88,220 92,220 96,220 100,220 104,220 108,220 112,220 116,220 120,220 124,220 128,220 132,220 136,220 144,220 148,220 152,220 156,220 160,220 164,220 172,220 176,220 180,220 184,220 188,220 192,220 196,220 200,220 204,220 208,220 212,220 216,220 220,220 224,220 228,220 232,220 236,220 240,220 244,220 248,220 256,220 260,220 264,220 268,220 272,220 276,220 284,220 288,220 292,220 296,220 22,224 66,224 70,224 74,224 78,224 82,224 86,224 90,224 94,224 98,224 102,224 106,224 110,224 118,224 122,224 126,224 130,224 134,224 138,224 142,224 146,224 150,224 154,224 158,224 162,224 166,224 170,224 174,224 178,224 182,224 186,224 190,224 194,224 198,224 202,224 206,224 214,224 218,224 222,224 226,224 230,224 234,224 238,224 242,224 246,224 250,224 254,224 258,224 262,224 266,224 270,224 274,224 278,224 282,224 286,224 290,224 294,224 298,224 4,228 76,228 80,228 88,228 92,228 96,228 100,228 104,228 108,228 112,228 116,228 120,228 124,228 128,228 132,228 136,228 144,228 148,228 152,228 156,228 160,228 164,228 172,228 176,228 180,228 184,228 188,228 192,228 196,228 200,228 204,228 208,228 212,228 216,228 220,228 228,228 232,228 236,228 240,228 244,228 248,228 256,228 260,228 264,228 268,228 272,228 276,228 284,228 288,228 292,228 296,228 70,232 74,232 78,232 82,232 90,232 94,232 98,232 102,232 106,232 110,232 118,232 122,232 126,232 130,232 134,232 138,232 146,232 150,232 154,232 158,232 162,232 166,232 174,232 178,232 182,232 186,232 190,232 194,232 202,232 206,232 210,232 214,232 218,232 222,232 230,232 234,232 238,232 242,232 246,232 250,232 258,232 262,232 266,232 270,232 274,232 278,232 286,232 290,232 294,232 298,232 4,236 12,236 16,236 20,236 40,236 44,236 68,236 76,236 80,236 92,236 96,236 100,236 104,236 108,236 120,236 124,236 128,236 132,236 136,236 148,236 152,236 156,236 160,236 164,236 176,236 180,236 184,236 188,236 192,236 204,236 208,236 212,236 216,236 220,236 232,236 236,236 240,236 244,236 248,236 260,236 264,236 268,236 272,236 276,236 288,236 292,236 296,236 6,240 26,240 54,240 66,240 70,240 74,240 78,240 86,240 94,240 98,240 102,240 106,240 114,240 122,240 126,240 130,240 134,240 150,240 154,240 158,240 162,240 174,240 178,240 182,240 186,240 190,240 202,240 206,240 210,240 214,240 218,240 230,240 234,240 238,240 242,240 246,240 258,240 262,240 266,240 270,240 274,240 286,240 290,240 294,240 298,240 12,244 16,244 20,244 24,244 28,244 32,244 36,244 40,244 44,244 48,244 52,244 56,244 60,244 64,244 68,244 80,244 84,244 88,244 92,244 96,244 100,244 104,244 108,244 112,244 116,244 120,244 124,244 128,244 132,244 136,244 140,244 144,244 148,244 152,244 156,244 160,244 164,244 168,244 172,244 176,244 188,244 192,244 196,244 200,244 204,244 208,244 212,244 216,244 220,244 224,244 228,244 232,244 236,244 240,244 244,244 248,244 252,244 256,244 260,244 264,244 268,244 272,244 276,244 280,244 284,244 288,244 10,248 14,248 18,248 22,248 26,248 30,248 34,248 38,248 42,248 46,248 50,248 54,248 58,248 62,248 66,248 70,248 78,248 82,248 86,248 90,248 94,248 98,248 102,248 106,248 110,248 114,248 118,248 122,248 126,248 130,248 134,248 138,248 142,248 146,248 150,248 154,248 158,248 162,248 166,248 170,248 174,248 178,248 190,248 194,248 198,248 202,248 206,248 210,248 214,248 218,248 222,248 226,248 230,248 234,248 238,248 242,248 246,248 250,248 254,248 258,248 262,248 266,248 270,248 274,248 278,248 282,248 286,248 290,248
  other v2: 17.2,2.8 4.8,6 70.1,6.1 14.7,6.5 1.3,7.1 6.1,9.9 83.1,10.8 1.2,10.9 77.5,10.9 74.7,11 69.3,12.6 6.4,12.7 78.7,13.9 82.9,14.1 86.5,14.1 3.6,14.7 19.9,15.7 86.1,17.6 82.3,19 86.3,20.2 19.7,22.4 77.4,27.7 17.7,29.2 25.4,29.6 32.8,30.5 20.4,33.9 81.2,66.8 64.7,68.3 55.2,68.4 60.2,68.6 50.2,68.9 67.9,69.2 52.2,69.9 43.8,71.1 38,71.8 47.1,71.8 32.2,72.2 73,72.7 66.2,73.6 46.9,74.3 29.6,74.5 44.4,74.8 80.6,75.3 61.3,75.6 27.7,75.7 31.3,75.7 43.6,77.7 27.4,77.8 37.8,78.5 61.5,78.5 18.2,78.7 67.5,78.8 72.2,79 32.7,79.4 19.9,80.2 59.3,80.3 17.8,81.4 21.3,81.9 16,82.7 60.8,82.7 55.2,83 59.7,84 14.1,84.2 49.9,84.6 29.5,85.1 12.7,85.4 65.6,86.8 32.3,88.9 39.6,88.9 62.5,89.6 66.8,90.1 61.8,91.6 66.5,92.4 12.2,94.7 65.7,95.5 64.9,97.4 12,97.9 46.2,98 12,100.4 34.5,102.8 46.3,102.9 22,103.4 42.7,103.5 55.1,105.7 37.7,107.3 40.2,107.9 52,107.9 62.3,108.7 12.9,108.9 16.9,109.3 50.2,109.8 33.1,110.3 29.9,110.4 20,112 15.9,112.3 59.8,112.4 43,114.6 18.2,114.7 45.6,114.8 56.2,116.1 39.5,116.6 28.6,116.7 31.8,116.7 54.4,119.4 63.3,119.7 50.8,120.6 60.9,121.9 53.3,123.5 42.9,123.8 57,124.7 47.8,125.6 36.2,126.6 59.6,127 53.5,127.3 56.9,128.1 53.3,130.6 59.8,130.8 57,131.7 36.8,137.3 60.6,137.7 57.7,139.8 37,140 39,142.3 46.2,143.4 48.1,145.1 50.8,146.9
HB: DL-1.4 H1.9 H2.14 H3.14 H4.14 JHB.3 LED1-14.2 N1.2 | length 406.8
  Top Layer w0.3: v1(48,12.9) 48.6,12.3 63.4,12.3 68.1,7.6 v1(68.1,6) ; DL-1.4@140.846,77.9 140.846,77.475 141.421,76.9 143.246,76.9 N1.2@143.346,76.8 144.8,76.8 ; JHB.3@144.8,79.509 144.924,79.385 144.924,78.876 145.1,78.7 145.1,77.1 144.8,76.8 ; LED1-14.2@150.546,79.2 150.746,79 150.8,78.946 150.8,75.35 ; v1(178.6,75.3) 177.7,74.4 151.8,74.4 150.85,75.35 150.8,75.35 ; v1(185.2,18.2) 184.9,17.9 184.9,7.873 185.5,7.273 v1(185.5,7.2) ; H2.14@256.02,7.14 256.02,8.72 261.526,14.226 261.774,14.226 v1(261.8,14.2) ; 144.8,76.8 148.1,76.8 149.55,75.35 150.8,75.35
  Bottom Layer w0.3: H4.14@46.22,7.14 46.22,11.12 v1(48,12.9) ; v1(68.1,6) 68.1,5.4 68.7,4.8 93.8,4.8 98.2,9.2 150.4,9.2 ; H3.14@151.12,7.14 151.12,8.48 150.4,9.2 ; v1(178.6,75.3) 178.5,75.3 176.8,73.6 176.8,51.7 182.5,46 182.5,27.4 185.2,24.7 v1(185.2,18.2) ; v1@185.8,7.5 244.2,7.5 245.9,9.2 254.4,9.2 255.1,8.5 255.1,8.129 256.02,7.209 H2.14@256.02,7.14 ; 185.9,7.6 v1(185.5,7.2) 183.5,9.2 150.4,9.2 ; v1(261.8,14.2) 268.9,14.2 271.1,16.4 271.1,23.3 275.2,27.4 289.955,27.4 292.255,25.1 296.1,25.1 297.6,26.6 297.6,28.5 296.7,29.4 295.664,29.4 H1.9@295.421,29.643
HB\: JHB.2 PWM1.23 PWM2.23 ShiftLED2.3 | length 243
  Top Layer w0.3: PWM1.23@46.546,135.4 53.2,135.4 55.4,133.2 55.4,122.4 v1(64.4,113.4) ; ShiftLED2.3@72.7,80.8 73.6,80.8 ; v1(73.9,79.2) 73.785,79.315 73.785,80.077 73.6,80.262 73.6,80.8 ; v1(99.3,82) 98.8,82.5 76.2,82.5 74.5,80.8 73.6,80.8 ; v1(108.1,87.3) 109.8,87.3 115.8,81.3 119.9,81.3 120.2,81.6 126.138,81.6 126.438,81.9 v1(126.6,81.9) ; v1(144.5,81.1) 144.662,81.1 144.862,80.9 145.3,80.9 145.8,80.4 JHB.2@145.8,79.5 ; v1(144.888,74.69) 146.478,73.1 198.3,73.1 206.9,64.5 215.3,64.5 217,66.2 PWM2.23@222.8,66.2
  Bottom Layer w0.3: v1(64.4,113.4) 65.8,112 65.8,100.2 73.9,92.1 v1(73.9,79.2) ; v1(99.3,82) 101.038,82 106.338,87.3 v1(108.1,87.3) ; v1(126.6,81.9) 143.7,81.9 v1(144.5,81.1) 144.5,80.938 144.888,80.55 v1(144.888,74.69)
HB_OUT: DL-1.1 MCU1.32 WD1.4 | length 12.9
  Top Layer w0.3: MCU1.32@134.146,68.8 134.146,72.975 135.096,73.925 WD1.4@135.096,74.65 135.096,76.196 135.4,76.5 138.3,76.5 138.7,76.1 139.521,76.1 139.546,76.075 DL-1.1@139.546,75.7
LA0: Cnt1.3 LA0.1 | length 21.2
  Top Layer w0.3: Cnt1.3@27.6,100.15 24.776,100.15 24.6,100.326 24.6,102.6 28.2,106.2 34.3,106.2 36.668,108.568 LA0.1@36.668,109.863
LA1: Cnt1.2 LA1.1 | length 23.8
  Top Layer w0.3: Cnt1.2@27.6,100.8 26.076,100.8 25.9,100.976 25.9,102.7 28.6,105.4 43.258,105.4 LA1.1@44.573,106.716
LA2: Cnt1.4 LA2.1 | length 53.6
  Top Layer w0.3: v1(18.8,98.1) 21.031,98.1 21.331,97.8 22.5,97.8 24.2,99.5 Cnt1.4@27.6,99.5 ; LA2.1@49.144,99.495 49.144,99.301 49.956,98.489 v1(49.956,98.344)
  Bottom Layer w0.3: v1(18.8,98.1) 19.4,98.7 19.4,102.3 26.4,109.3 32.6,109.3 42.2,99.7 48.6,99.7 v1(49.956,98.344)
LA3: Cnt1.7 LA3.1 | length 42.1
  Top Layer w0.3: v1(22.5,94.9) 22.55,94.95 23.55,94.95 26.15,97.55 Cnt1.7@27.6,97.55 ; LA3.1@48.706,90.982 48.706,90.829 47.893,90.017 47.893,89.507 v1(49,88.4)
  Bottom Layer w0.3: v1(22.5,94.9) 24.6,92.8 24.6,91 29.4,86.2 38,86.2 38.5,85.7 46.3,85.7 v1(49,88.4)
LA4: Cnt1.10 LA4.1 | length 26.6
  Top Layer w0.3: Cnt1.10@33.4,97.55 36.55,97.55 v1(37.1,98.1) ; LA4.1@43.153,84.455 43.197,84.499 43.197,87.397 v1(44,88.2)
  Bottom Layer w0.3: v1(37.1,98.1) 37.1,97.4 35.3,95.6 35.3,93.9 37.3,91.9 39.2,91.9 40.3,93 42.1,93 43.8,91.3 43.8,88.4 v1(44,88.2)
LA5: Cnt1.1 LA5.1 | length 39.5
  Top Layer w0.3: Cnt1.1@27.6,101.45 v1(27.6,102.4) ; v1(30.8,82.7) 34.545,82.7 LA5.1@34.915,82.33
  Bottom Layer w0.3: v1(27.6,102.4) 22.3,102.4 20.5,100.6 20.5,97.9 19.4,96.8 18.9,96.8 17.7,95.6 17.7,94.6 25.2,87.1 25.2,85.5 28,82.7 v1(30.8,82.7)
LA6: Cnt1.5 LA6.1 | length 23.5
  Top Layer w0.3: v1(19.1,94.9) 19.1,95.5 20.4,96.8 22.4,96.8 24.45,98.85 Cnt1.5@27.6,98.85 ; v1(26.6,86.1) 26.6,85.992 LA6.1@27.083,85.509
  Bottom Layer w0.3: v1(19.1,94.9) 27,87 27,86.5 v1(26.6,86.1)
LA7: Cnt1.6 LA7.1 | length 11.4
  Top Layer w0.3: LA7.1@22.555,92.683 21,94.238 21,95.824 21.176,96 22.7,96 24.9,98.2 Cnt1.6@27.6,98.2
LA8: Cnt1.9 LA8.1 | length 33.4
  Top Layer w0.254: LA8.1@23.001,101.205 23.001,103.001 24.179,104.179 24.179,105.579 v1(25,106.4) ; Cnt1.9@33.4,96.9 38.225,96.9 38.525,97.2 v1(38.7,97.2)
  Bottom Layer w0.254: v1(25,106.4) 25,106.5 27.1,108.6 31.7,108.6 38.7,101.6 v1(38.7,97.2)
LA9: Cnt1.11 LA9.1 | length 17.9
  Top Layer w0.254: LA9.1@28.446,107.753 29.123,107.753 29.252,107.624 29.476,107.624 v1(29.6,107.5) ; Cnt1.11@33.4,98.2 35.4,98.2 v1(35.7,98.5)
  Bottom Layer w0.254: v1(29.6,107.5) 31.6,107.5 37.3,101.8 37.3,99.8 36.124,98.624 35.824,98.624 v1(35.7,98.5)
LB0: Cnt2.3 LB0.1 | length 65
  Top Layer w0.3: v1(19.978,86.038) 21.238,86.038 24.82,89.62 24.82,92.787 25.833,93.8 Cnt2.3@27.7,93.8 ; LB0.1@36.7,114.85 36.775,114.85 38.185,113.44 38.185,113.115 v1(38.3,113)
  Bottom Layer w0.3: v1(19.978,86.038) 18.062,86.038 14.2,89.9 14.2,102.5 26.2,114.5 36.8,114.5 v1(38.3,113)
LB1: Cnt2.2 LB1.1 | length 68.1
  Top Layer w0.3: v1(20,87.4) 21.5,87.4 24.2,90.1 24.2,93.3 25.35,94.45 Cnt2.2@27.7,94.45 ; v1(40.7,111) 40.8,111.1 40.9,111 45.2,111 45.8,110.4 46.6,110.4 46.94,110.74 LB1.1@47.549,110.74
  Bottom Layer w0.3: v1(20,87.4) 15.1,92.3 15.1,102.2 26.6,113.7 35.364,113.7 38.064,111 v1(40.7,111)
LB2: Cnt2.4 LB2.1 | length 89.4
  Top Layer w0.3: v1(20.9,84.9) 21,84.9 25.4,89.3 25.4,92.3 26.25,93.15 Cnt2.4@27.7,93.15 ; LB2.1@53.91,101.038 54.225,100.724 54.225,100.138 54.4,99.962 v1(54.4,99.8)
  Bottom Layer w0.3: v1(20.9,84.9) 18,84.9 13.451,89.449 13.451,103.844 25.024,115.417 38.783,115.417 v1(54.4,99.8)
LB3: Cnt2.7 LB3.1 | length 29.6
  Top Layer w0.3: Cnt2.7@27.7,91.2 29.438,91.2 29.738,90.9 v1(29.9,90.9) ; v1(52.8,88.4) 52.915,88.515 52.915,88.71 53.354,89.15 LB3.1@53.354,89.45
  Bottom Layer w0.3: v1(29.9,90.9) 32.8,90.9 35.4,88.3 38.5,88.3 39.6,87.2 45.965,87.2 48.465,89.7 51.5,89.7 v1(52.8,88.4)
LB4: Cnt2.10 LB4.1 | length 21.2
  Top Layer w0.3: Cnt2.10@33.5,91.2 35,91.2 35.5,90.7 35.5,84.6 36.6,83.5 37.4,83.5 41.112,79.788 41.2,79.7 45.391,79.7 45.479,79.788 LB4.1@46.093,80.402
LB5: Cnt2.1 LB5.1 | length 28.4
  Top Layer w0.3: v1(26.1,95.8) 26.225,95.8 26.925,95.1 Cnt2.1@27.7,95.1 ; v1(31.076,87.839) 31.076,84.876 29.1,82.9 29.1,81 32.7,77.4 34.85,77.4 LB5.1@34.9,77.35
  Bottom Layer w0.3: v1(26.1,95.8) 26.1,90.5 29,87.6 30.837,87.6 v1(31.076,87.839)
LB6: Cnt2.5 LB6.1 | length 20
  Top Layer w0.3: LB6.1@24.051,81.46 22.9,82.611 22.9,84.5 27,88.6 29.956,88.6 31.5,90.144 31.5,91.4 30.4,92.5 Cnt2.5@27.7,92.5
LB7: Cnt2.6 LB7.1 | length 24.1
  Top Layer w0.3: LB7.1@18.004,90.848 LB7.1@17.69,91.162 18.145,91.055 18.284,91.1 cw(c18.376,90.814) 18.662,90.907 ; 18.662,90.906 19.4,88.6 18.85,88.05 18.05,88.05 17.5,87.5 17.5,85.7 19.4,83.8 21.2,83.8 26,88.6 26,91.5 26.35,91.85 Cnt2.6@27.7,91.85
LB8: Cnt2.9 LB8.1 | length 47.4
  Top Layer w0.3: LB8.1@18.246,102.75 18.246,103.846 v1(18.8,104.4) ; Cnt2.9@33.5,90.55 33.5,83.7 v1(33.516,83.684)
  Bottom Layer w0.3: v1(18.8,104.4) 17.2,102.8 17.2,100.6 16,99.4 16,93.7 23.2,86.5 23.2,83.7 26.2,80.7 32.2,80.7 33.516,82.016 v1(33.516,83.684)
LB9: Cnt2.11 LB9.1 | length 64.4
  Top Layer w0.3: LB9.1@25.507,111.798 25.551,111.842 26.88,111.842 27.138,112.1 v1(27.3,112.1) ; Cnt2.11@33.5,91.85 35.85,91.85 36.1,91.6 36.1,86.3 v1(37.2,85.2)
  Bottom Layer w0.3: v1(27.3,112.1) 27.185,111.985 25.985,111.985 20.2,106.2 20.2,104.4 18.3,102.5 18.3,100 16.7,98.4 16.7,94.5 24.1,87.1 24.1,84.8 27.2,81.7 31.9,81.7 32.2,82 32.2,84.7 32.7,85.2 v1(37.2,85.2)
LC0: Cnt3.3 LC0.1 | length 59.8
  Top Layer w0.3: LC0.1@36.7,119.85 36.75,119.9 v1(38.4,119.9) ; Cnt3.3@44.3,91.9 47.5,91.9 48.045,92.445 48.045,93.145 48.954,94.054 59.754,94.054 62,96.3 62,97.9 v1(61.8,98.1)
  Bottom Layer w0.3: v1(38.4,119.9) 44,119.9 50.8,113.1 53.4,113.1 61.8,104.7 v1(61.8,98.1)
LC1: Cnt3.2 LC1.1 | length 47.5
  Top Layer w0.3: Cnt3.2@44.3,91.25 46.15,91.25 v1(46.8,90.6) ; LC1.1@50.488,114.785 50.553,114.721 52.679,114.721 v1(52.7,114.7) ; v1(54.3,92.9) 54.415,93.015 54.728,93.015 54.776,93.062 60.062,93.062 v1(62.8,95.8)
  Bottom Layer w0.3: v1(46.8,90.6) 53.2,90.6 54.45,91.85 54.45,92.15 54.415,92.185 54.415,92.785 v1(54.3,92.9) ; v1(52.7,114.7) 53.5,114.7 62.8,105.4 v1(62.8,95.8)
LC2: Cnt3.4 LC2.1 | length 23.8
  Top Layer w0.3: Cnt3.4@44.3,92.55 46.85,92.55 47.2,92.9 47.2,93.241 48.621,94.663 58.163,94.663 59.5,96 59.5,101.77 LC2.1@58.679,102.591
LC3: Cnt3.7 LC3.1 | length 37.7
  Top Layer w0.3: Cnt3.7@44.3,94.5 45.7,94.5 47.6,96.4 47.6,102 48.9,103.3 51.6,103.3 52.3,102.6 52.3,101.3 53,100.6 53,98.992 53.392,98.6 55.4,98.6 v1(55.9,99.1) ; LC3.1@58.109,87.905 57.1,88.914 57.1,89.4 57.6,89.9 57.6,90.8 58.5,91.7 v1(59.6,91.7)
  Bottom Layer w0.3: v1(55.9,99.1) 56,99 56.8,99 59.6,96.2 v1(59.6,91.7)
LC4: Cnt3.10 LC4.1 | length 47.1
  Top Layer w0.3: v1(36.6,94.6) 36.7,94.5 Cnt3.10@38.5,94.5 ; v1(47.9,75.8) 47.962,75.8 48.519,76.357 LC4.1@49.032,76.357 ; v1(51.6,95.7) v1(55.1,95.7)
  Bottom Layer w0.3: v1(36.6,94.6) 36.673,94.6 37.273,95.2 50.038,95.2 50.538,95.7 v1(51.6,95.7) ; v1(47.9,75.8) 50.7,75.8 51.4,76.5 51.4,84.9 55.5,89 55.5,95.224 55.1,95.624 v1(55.1,95.7)
LC5: Cnt3.1 LC5.1 | length 34.9
  Top Layer w0.3: LC5.1@34.941,72.236 35.013,72.236 35.788,73.011 35.788,73.388 36,73.6 40.6,73.6 v1(41.5,72.7) ; Cnt3.1@44.3,90.6 45.075,90.6 46.275,89.4 46.275,88.925 47.8,87.4 50.4,87.4 v1(50.8,87.8)
  Bottom Layer w0.3: v1(41.5,72.7) 41.5,78.5 v1(50.8,87.8)
LC6: Cnt3.5 LC6.1 | length 76.6
  Top Layer w0.3: LC6.1@21.007,77.361 21.519,77.361 21.858,77.7 22.6,77.7 32,68.3 v1(41.4,68.3) ; Cnt3.5@44.3,93.2 46.3,93.2 49.8,96.7 57,96.7 v1(57.4,96.3)
  Bottom Layer w0.3: v1(41.4,68.3) 46.3,68.3 52.4,74.4 52.4,84.6 57.4,89.6 v1(57.4,96.3)
LC7: Cnt3.6 LC7.1 | length 98
  Top Layer w0.3: v1(12.2,91) 12.723,90.477 12.723,89.782 LC7.1@12.968,89.537 ; Cnt3.6@44.3,93.85 45.95,93.85 49.5,97.4 57.3,97.4 58.5,98.6 v1(58.5,100.1)
  Bottom Layer w0.3: v1(12.2,91) 10.8,92.4 10.8,104.8 23.9,117.9 44.7,117.9 50.3,112.3 52.5,112.3 58.5,106.3 v1(58.5,100.1)
LC8: Cnt3.9 LC8.1 | length 63.8
  Top Layer w0.3: LC8.1@13.491,104.295 13.534,104.338 13.534,105.334 15.6,107.4 22.782,107.4 v1(22.803,107.379) ; Cnt3.9@38.5,95.15 39.275,95.15 40.5,96.375 v1(40.5,96.6)
  Bottom Layer w0.3: v1(22.803,107.379) 22.966,107.379 23.087,107.5 23.2,107.5 26.1,110.4 27.6,110.4 28.7,111.5 34.1,111.5 36.3,109.3 42.75,109.3 52,100.05 52,97.9 50.9,96.8 40.862,96.8 40.662,96.6 v1(40.5,96.6)